# Altium PCB BD1_yd_V1.0.PcbDoc (part 1 of 2)
Units mm, origin at the board's own origin, x right, y up, seen from the top; angles counter-clockwise.
Board outline 135.9 x 133.4 mm, 4 copper layers (Top Layer, Signal Layer 1, Signal Layer 2, Bottom Layer), stack 0.778 mm thick; 102 components, 201 nets, 640 pads, 101 vias.
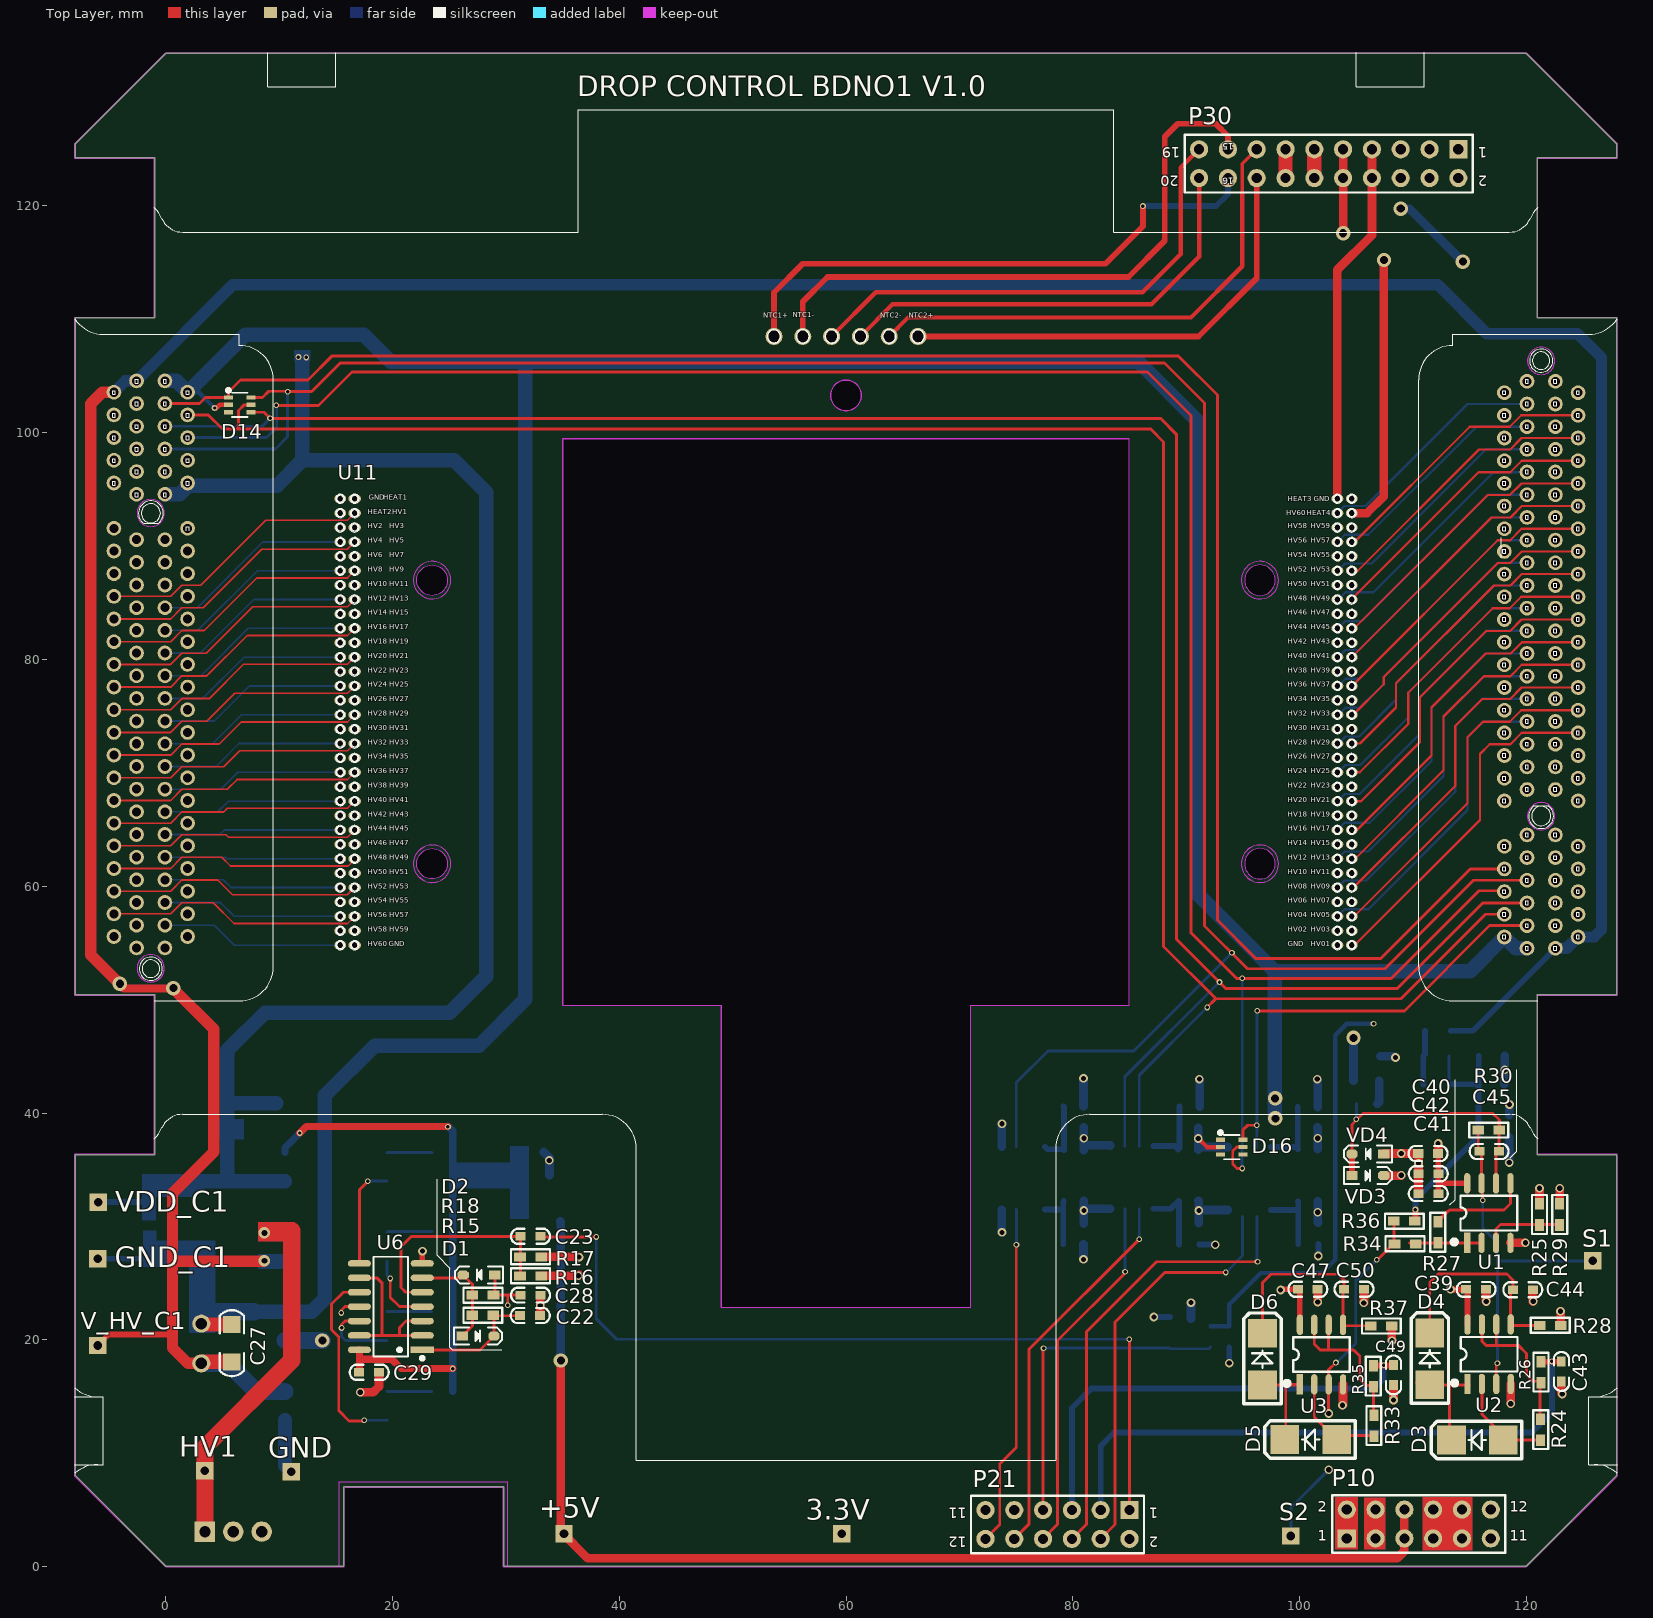
[diagram p0: Top Layer view]
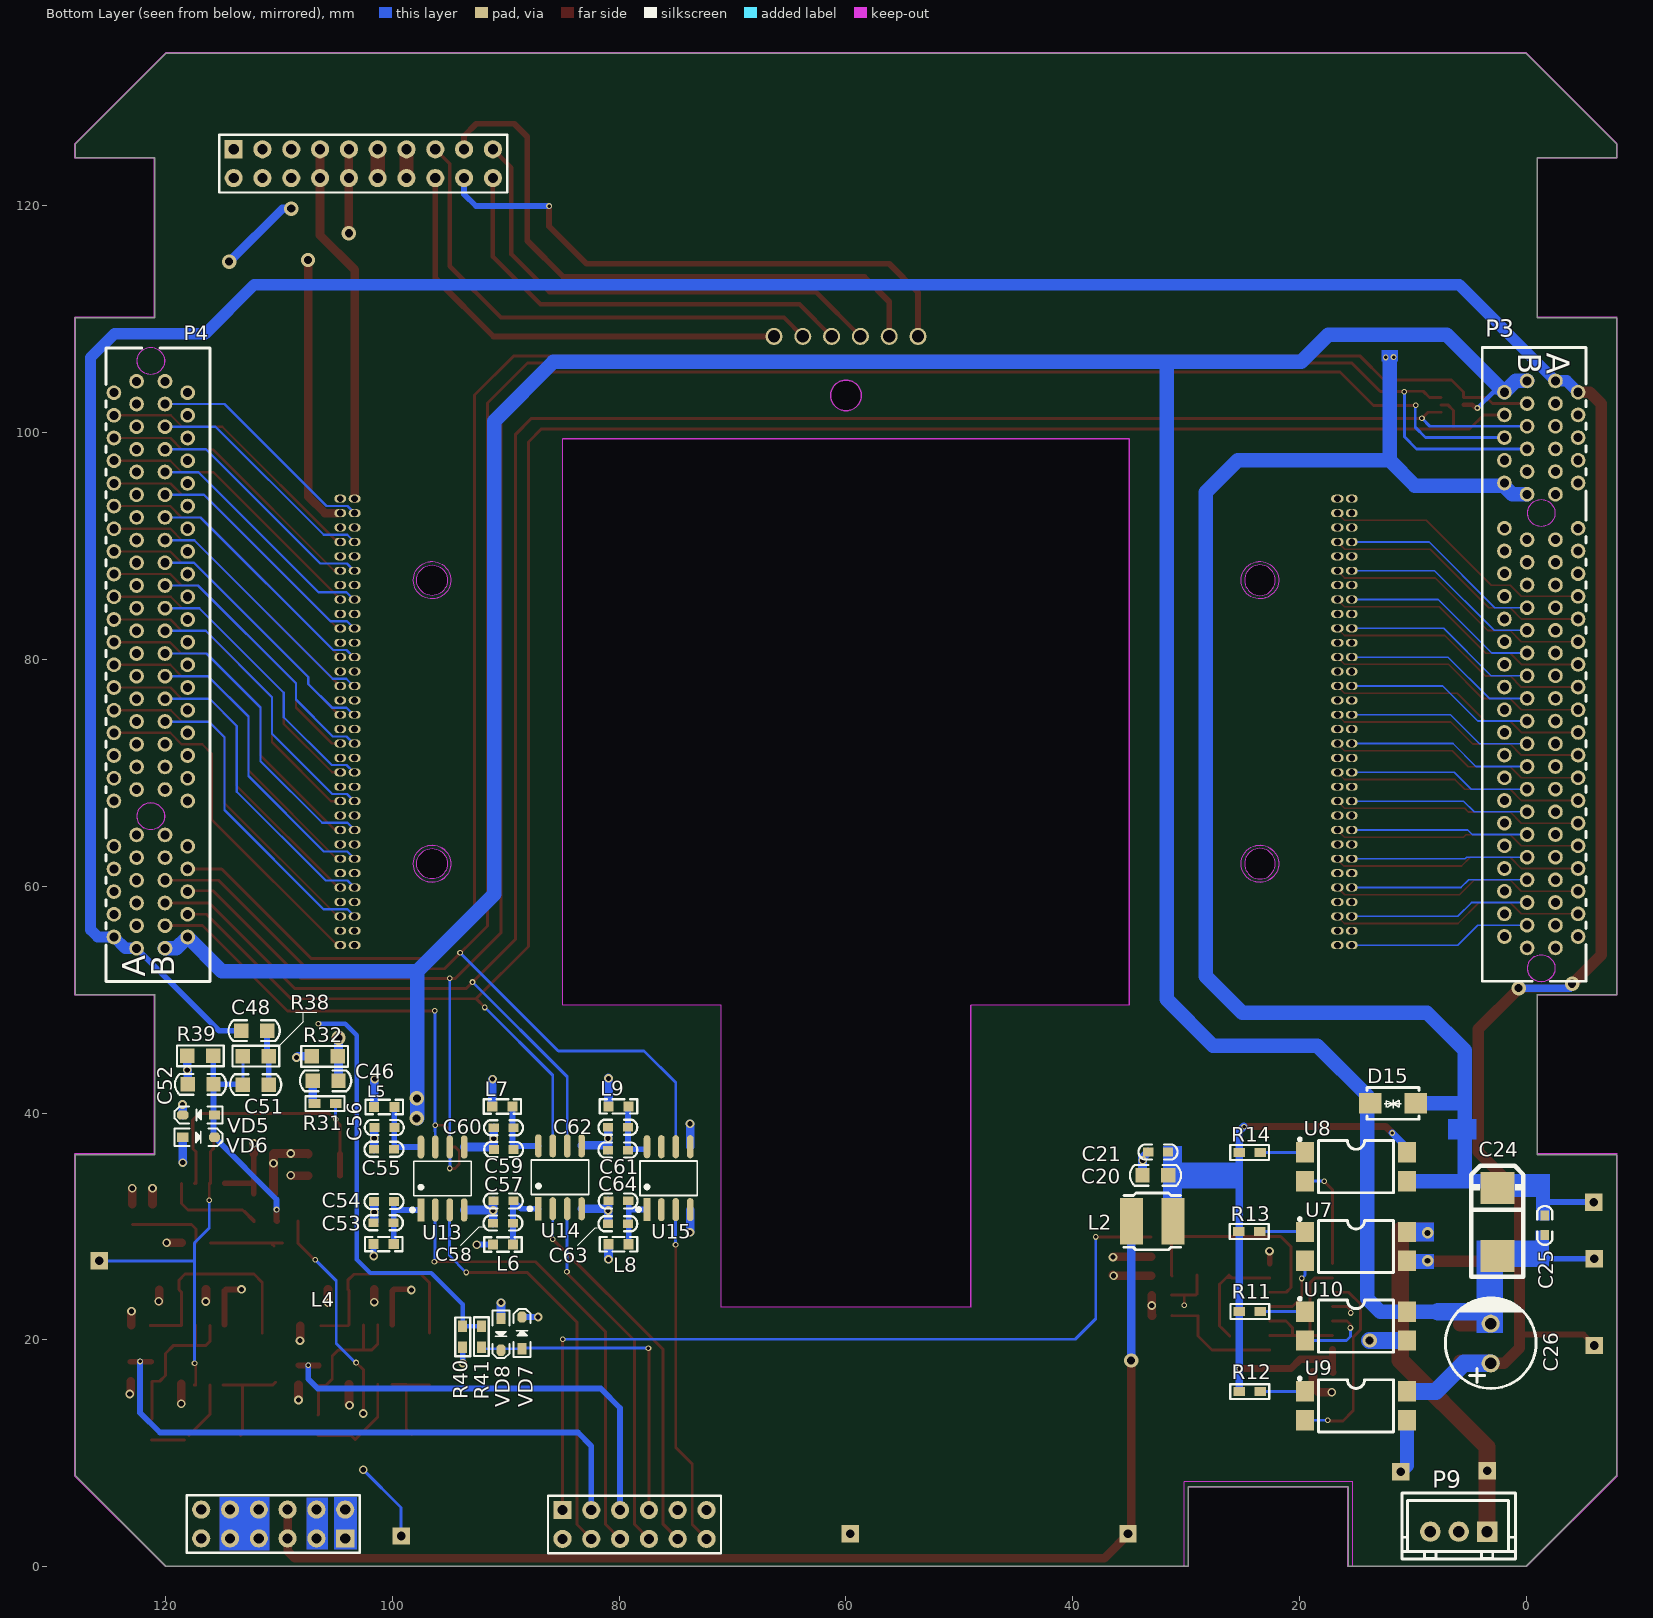
[diagram p1: Bottom Layer view, seen from below]
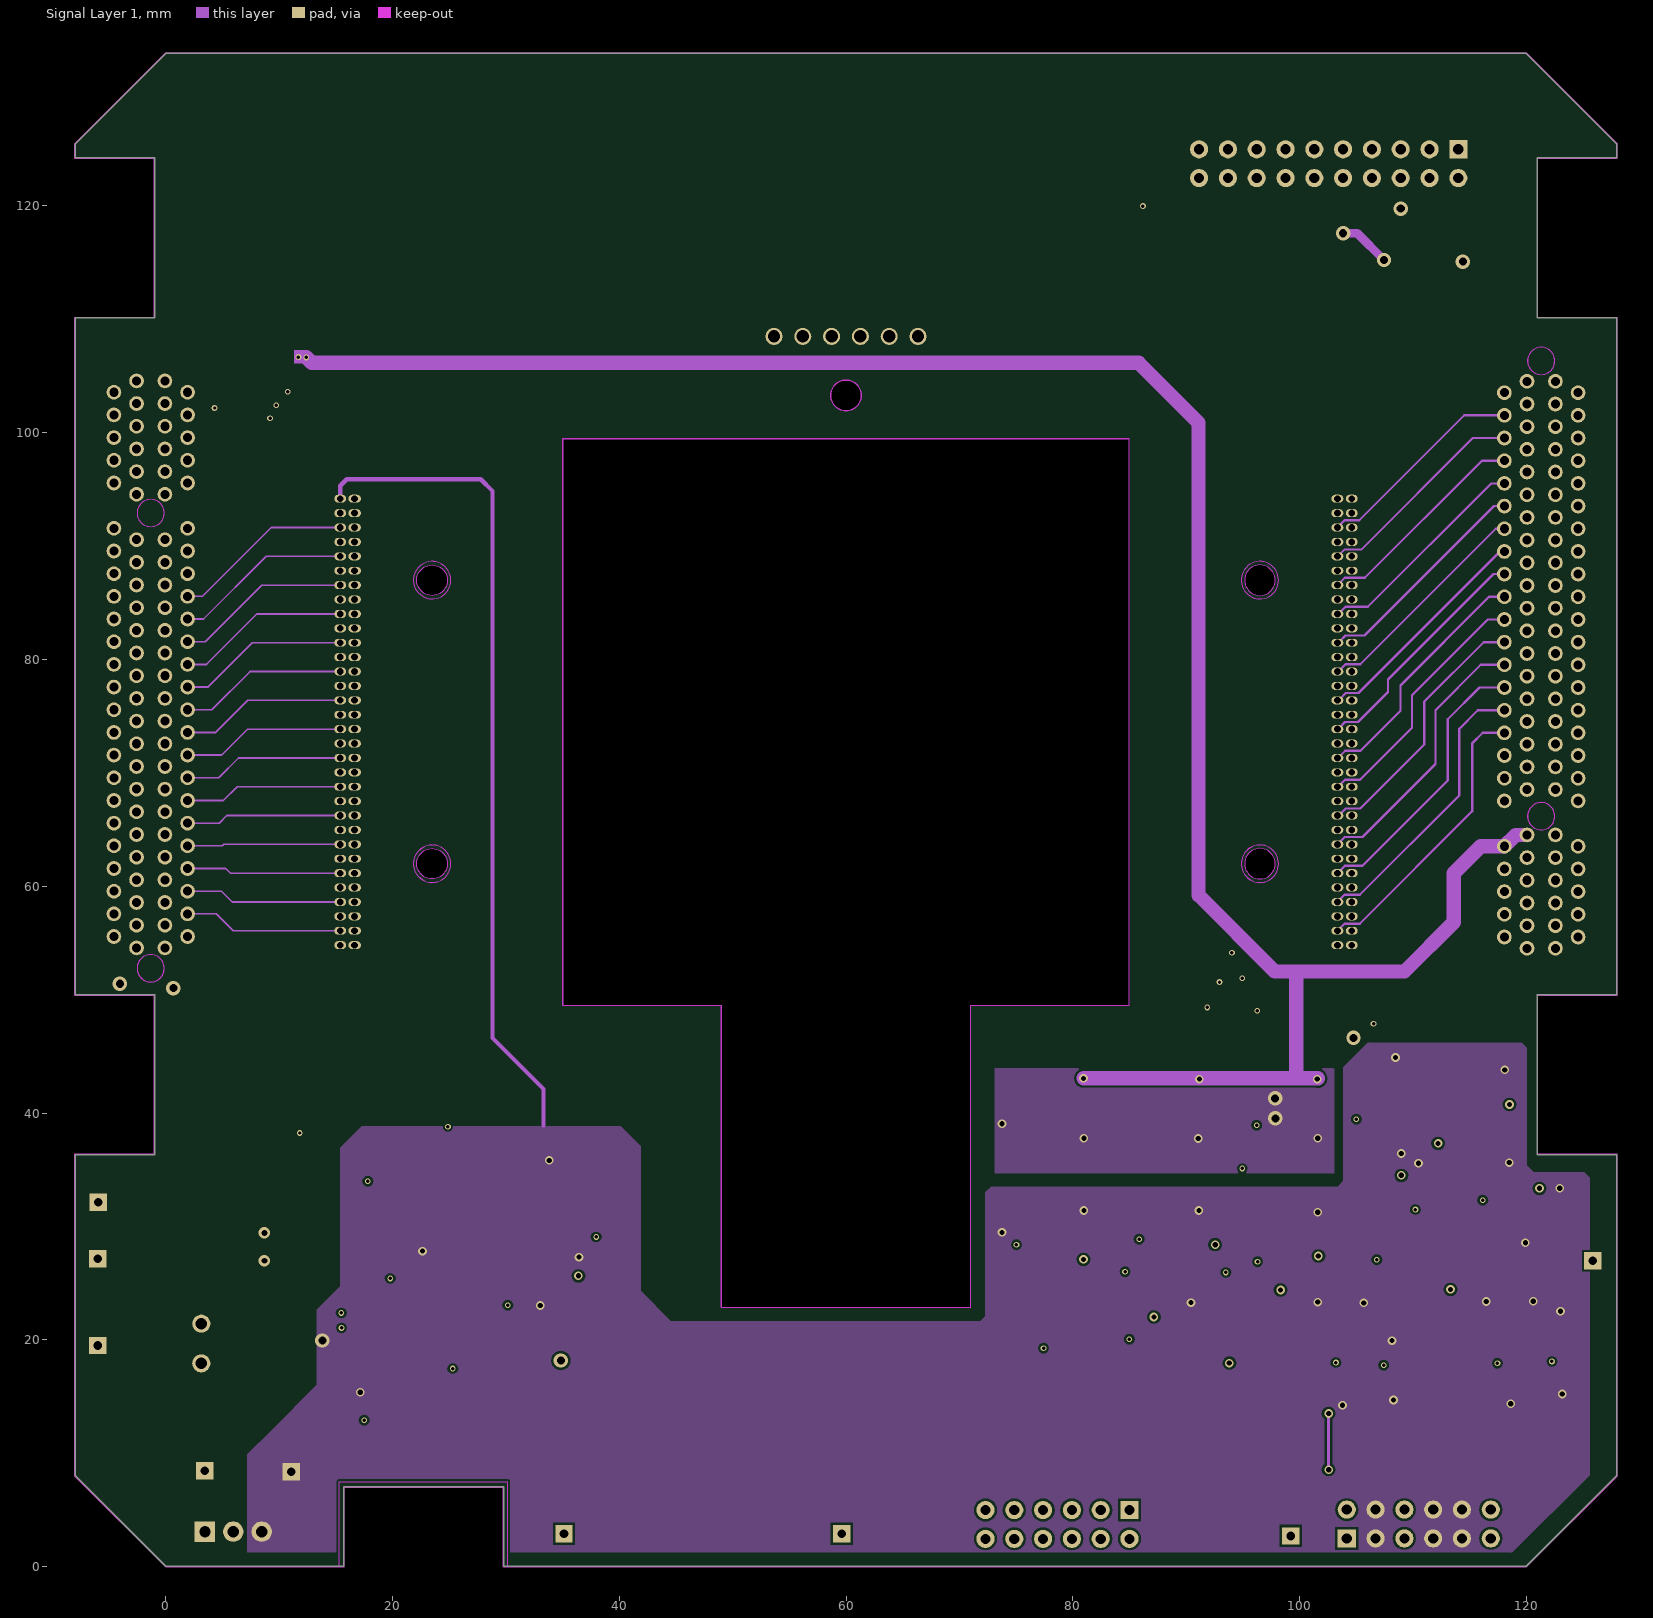
[diagram p2: Signal Layer 1]
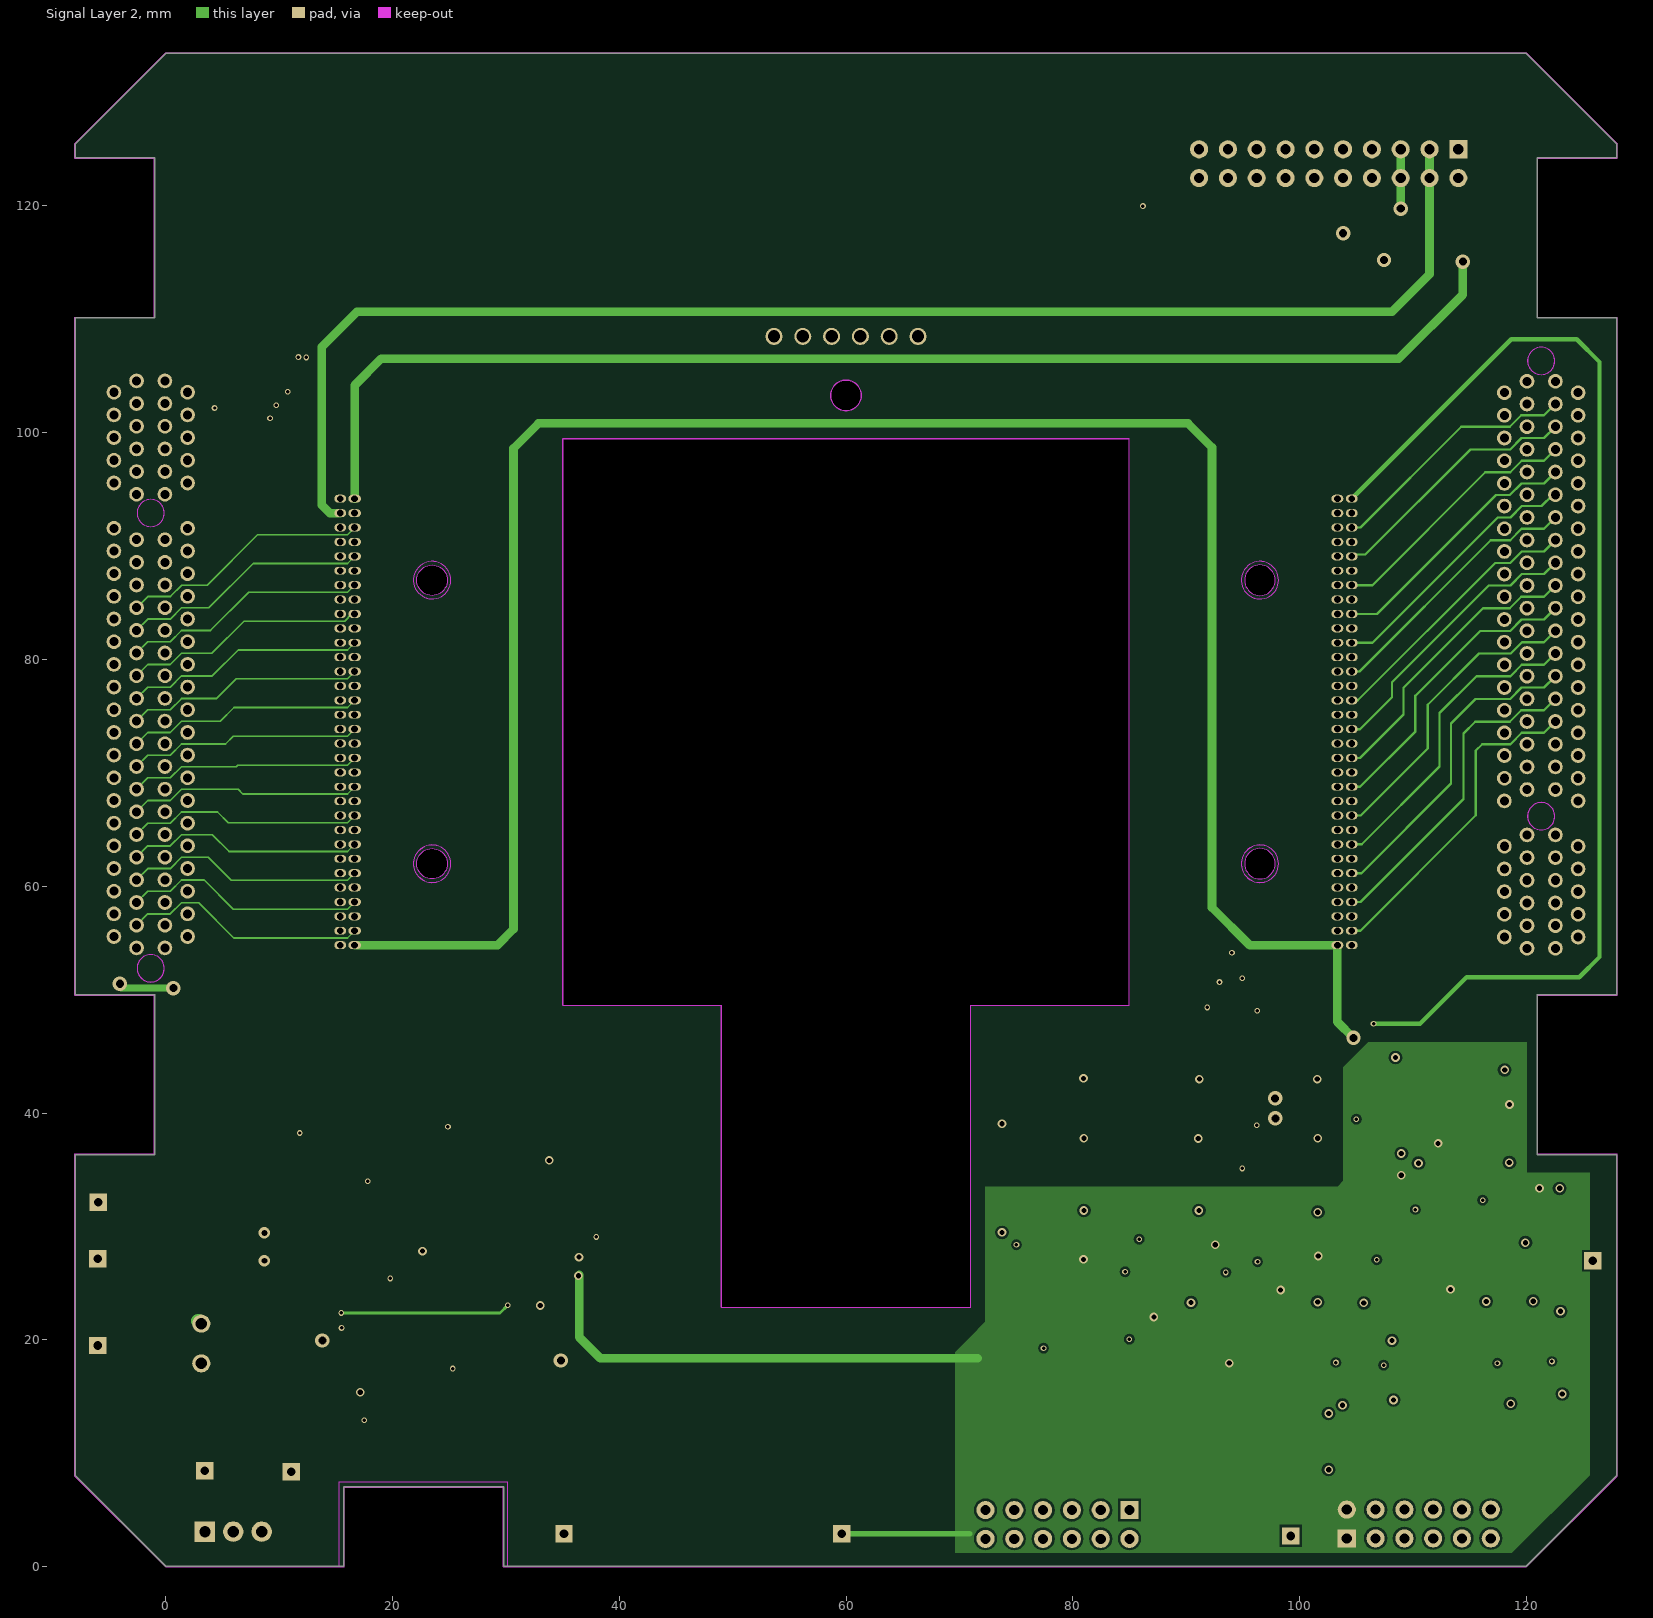
[diagram p3: Signal Layer 2]

## Layer stack, top to bottom
Top Layer: signal copper 0.0356
Dielectric: core 0.254, FR-4, Dk 4.2
Signal Layer 1: signal copper 0.036
Dielectric: prepreg 0.127, Dk 4.2
Signal Layer 2: signal copper 0.036
Dielectric: core 0.254, Dk 4.2
Bottom Layer: signal copper 0.0356

## Board outline
-7.95,8.021 -7.95,36.35 -1,36.35 ccw(c-1,36.4) -0.95,36.4 -0.95,50.4 ccw(c-1,50.4) -1,50.45 -7.95,50.45 -7.95,110.15 -1,110.15 ccw(c-1,110.2) -0.95,110.2 -0.95,124.2 ccw(c-1,124.2) -1,124.25 -7.95,124.25 -7.95,125.479 0.021,133.45 119.979,133.45 127.95,125.479 127.95,124.25 121,124.25 ccw(c121,124.2) 120.95,124.2 120.95,110.2 ccw(c121,110.2) 121,110.15 127.95,110.15 127.95,50.45 121,50.45 ccw(c121,50.4) 120.95,50.4 120.95,36.4 ccw(c121,36.4) 121,36.35 127.95,36.35 127.95,8.021 119.979,0.05 127.95,8.021 119.979,0.05 29.824,0.05 29.824,7 ccw(c29.773,7) 29.773,7.05 15.773,7.05 ccw(c15.773,7) 15.723,7 15.723,0.05 0.021,0.05
cut-out: 35,49.495 49,49.495 49,22.895 71,22.895 71,49.495 85,49.495 85,99.495 35,99.495
cut-out: 60,101.945 cw(c60,103.295) 58.65,103.295 cw(c60,103.295) 60,104.645 cw(c60,103.295) 61.35,103.295 cw(c60,103.295)
cut-out: 95.15,62 ccw(c96.5,62) 96.5,60.65 ccw(c96.5,62) 97.85,62 ccw(c96.5,62) 96.5,63.35 ccw(c96.5,62)
cut-out: 95.15,87 ccw(c96.5,87) 96.5,85.65 ccw(c96.5,87) 97.85,87 ccw(c96.5,87) 96.5,88.35 ccw(c96.5,87)
cut-out: 23.5,85.65 cw(c23.5,87) 22.15,87 cw(c23.5,87) 23.5,88.35 cw(c23.5,87) 24.85,87 cw(c23.5,87)
cut-out: 23.5,60.65 cw(c23.5,62) 22.15,62 cw(c23.5,62) 23.5,63.35 cw(c23.5,62) 24.85,62 cw(c23.5,62)

## Design rules (kind name [scope] priority, off if disabled: settings)
Clearance Clearance_2 [InComponent('U4')] p1: gap=0.178
Clearance Clearance_4 [InComponent('U11')] p2: gap=0.178
Clearance Clearance_1 [InComponent('USB1')] p3: gap=0.152
Clearance Clearance_3 [InNetClass('HV Class')] p4: gap=0.7
Clearance [All] p5: gap=0.203
HoleSize [All] p1: absolutevalues=TRUE maxlimit=2539.975 minlimit=0.025 maxpercent=80.000 minpercent=20.000
MinimumSolderMaskSliver [All] p1: minsoldermaskwidth=0
PlaneConnect [InPadClass('All Pads')] p1: planeconnectstyle=Direct reliefexpansion=0.508 reliefentries=4 reliefconductorwidth=0.254 reliefairgap=0.254
PolygonConnect PolygonConnect_2 [IsVia] p1: connectstyle=Direct reliefconductorwidth=0.254 reliefentries=4 polygonreliefangle="90 Angle" airgapwidth=0.254
PolygonConnect PolygonConnect_1 [All vs InNet('GND')] p2: connectstyle=Direct reliefconductorwidth=0.254 reliefentries=4 polygonreliefangle="90 Angle" airgapwidth=0.254
PolygonConnect [All] p3: connectstyle=Direct reliefconductorwidth=0.254 reliefentries=4 polygonreliefangle="90 Angle" airgapwidth=0.254
RoutingVias RoutingVias_2 [All] p1: holewidth=0.457 width=0.762 viastyle="Through Hole" minholewidth=0.305 minwidth=0.508 maxholewidth=0.711 maxwidth=1.27
RoutingVias RoutingVias_1 [All] p2: holewidth=0.305 width=0.508 viastyle="Through Hole" minholewidth=0.305 minwidth=0.508 maxholewidth=0.305 maxwidth=0.508
RoutingVias [All] p3: holewidth=0.305 width=2.54 viastyle="Through Hole" minholewidth=0.508 minwidth=2.54 maxholewidth=1.27 maxwidth=2.54
SilkToSilkClearance [All] p1: silktosilkclearance=0
SilkToSolderMaskClearance [IsPad] p1: minsilkscreentomaskgap=0 clearancetoexposedcopper=TRUE
SolderMaskExpansion [All] p1: expansion=0.102
Width [All] p1: maxlimit=5.08 minlimit=0.152 preferedwidth=0.254 minimp=50.000000 maximp=50.000000 favimp=50.000000
23 further rules are at their usual default settings.

## Classes and differential pairs
component class AC_SWITH: C20 C21 C22 C23 C24 C25 C26 C27 C28 C29 D1 D2 D15 L2 R11 R12 R13 R14 R15 R16 R17 R18 U6 U7 U8 U9 U10
component class Feedback: C39 C40 C41 C42 C43 C44 C45 C46 C47 C48 C49 C50 C51 C52 D3 D4 D5 D6 R24 R25 R26 R27 R28 R29 R30 R31 R32 R33 R34 R35 R36 R37 R38 R39 U1 U2 U3 VD3 VD4 VD5 VD6
component class ISO_signal: C53 C54 C55 C56 C57 C58 C59 C60 C61 C62 C63 C64 L4 L5 L6 L7 L8 L9 R40 R41 U13 U14 U15 VD7 VD8
component class ArrayPCIE: D14 D16 P3 P4 U11
component class Connect: P9 P10 P21 P30

## Components (designator, comment, footprint, x,y, rotation, side; value= is the part's Value field where it differs from the comment)
C20 "10uF" "C 0805" 32.712,34.521 r180 bottom
C21 "0.1uF" "C 0603" 32.484,36.578 r0 bottom
C22 "3.3nF" "C 0603" 32.154,22.151 r0 top
C23 "0.1uF" "C 0603" 32.179,29.136 r0 top
C24 "100uF/25V" CASE-D_7343 2.557,30.397 r90 bottom
C25 "0.1uF" "C 0603" -1.628,30.101 r270 bottom
C26 "4.7uF/400V" CAP-TH_BD8.0-P3.50-D0.6-FD 3.147,19.687 r90 bottom
C27 "0.1uF/450V" "C 1206" 5.839,19.713 r270 top
C28 "3.3nf" "C 0603" 32.179,23.954 r0 top
C29 "0.1uF" "C 0603" 17.955,17.147 r0 top
C39 "0.1uF" "C 0603" 115.57,24.46 r0 top
C40 "0.1uF" "C 0603" 111.328,36.449 r180 top
C41 "0.1uF" "C 0603" 111.349,32.908 r180 top
C42 "1uF" "C 0603" 111.349,34.661 r180 top
C43 "1uF" "C 0603" 123.088,17.221 r90 top
C44 "0.1uF" "C 0603" 119.685,24.435 r180 top
C45 "10pF" "C 0603" 116.713,36.627 r180 top
C46 "1uF" "C 0805" 105.893,42.85 r0 bottom
C47 "0.1uF" "C 0603" 100.732,24.477 r0 top
C48 "1uF" "C 0805" 112.192,47.269 r180 bottom
C49 "1uF" "C 0603" 108.28,16.916 r90 top
C50 "0.1uF" "C 0603" 104.796,24.477 r180 top
C51 "30pF" "C 0805" 112.065,42.52 r180 bottom
C52 "270pF" "C 0805" 116.916,42.545 r180 bottom
C53 "1uF" "C 0603" 100.793,30.331 r0 bottom
C54 "0.1uF" "C 0603" 100.743,32.211 r0 bottom
C55 "0.1uF" "C 0603" 100.743,36.808 r0 bottom
C56 "1uF" "C 0603" 100.717,38.738 r0 bottom
C57 "1uF" "C 0603" 90.227,32.261 r0 bottom
C58 "0.1uF" "C 0603" 90.252,30.306 r0 bottom
C59 "0.1uF" "C 0603" 90.194,36.796 r0 bottom
C60 "1uF" "C 0603" 90.202,38.713 r0 bottom
C61 "0.1uF" "C 0603" 80.114,36.745 r0 bottom
C62 "1uF" "C 0603" 80.114,38.752 r0 bottom
C63 "1uF" "C 0603" 80.114,30.243 r0 bottom
C64 "0.1uF" "C 0603" 80.092,32.261 r0 bottom
D1 "1N4148" SOD-323 27.556,20.348 r0 top
D2 "1N4148" SOD-323 27.632,25.732 r180 top
D3 "SS34" SMA 113.386,11.176 r180 top
D4 "SS34" SMA 111.481,20.625 r90 top
D5 "SS34" SMA 98.7,11.216 r180 top
D6 "SS34" SMA 96.723,20.599 r90 top
D14 "PESD5V0L5UY" SOT-363_L2.1-W1.3-P0.65-LS2.2-BL 6.528,102.464 r270 top
D15 "SMAJ5.0CA" SMA_L4.4-W2.6-LS5.0-BI 11.76,40.869 r180 bottom
D16 "PESD5V0L5UY" SOT-363_L2.1-W1.3-P0.65-LS2.2-BL 94.005,37.008 r270 top
L2 "10uH/2A" IND-SMD_L5.0-W5.0_LQH5BPBXX 32.992,30.457 r180 bottom
L4 "120欧姆磁珠" "L 0603" 100.768,28.451 r180 bottom
L5 "120欧姆磁珠" "L 0603" 100.717,40.542 r0 bottom
L6 "120欧姆磁珠" "L 0603" 90.252,28.426 r180 bottom
L7 "120欧姆磁珠" "L 0603" 90.303,40.593 r0 bottom
L8 "120欧姆磁珠" "L 0603" 80.052,28.441 r180 bottom
L9 "120欧姆磁珠" "L 0603" 80.052,40.604 r0 bottom
P3 "3091-10102T" CONN-TH_98P-P1.00-V_3183-XXXXXPXT -2.562,104.575 r270 bottom locked
P4 "3091-10102T" CONN-TH_98P-P1.00-V_3183-XXXXXPXT 122.559,54.537 r90 bottom locked
P9 "HX-XH2.54-3PZZ-R" CONN-TH_3P-P2.50_HX-XH2.54-3PZZ-B 5.969,3.099 r180 bottom
P10 "Header 6X2" HDR-6X2 104.16,2.5 r0 top locked
P21 "Header 6X2" HDR-6X2 85,5 r180 top locked
P30 "Header 10X2" HDR-10X2 114,125 r180 top
R11 "220" "R 0603" 24.381,22.507 r180 bottom
R12 "220" "R 0603" 24.399,15.445 r180 bottom
R13 "220" "R 0603" 24.432,29.568 r180 bottom
R14 "220" "R 0603" 24.407,36.527 r180 bottom
R15 "10K" "R 0603" 27.979,22.182 r180 top
R16 "15K" "R 0603" 32.179,25.656 r0 top
R17 "680K" "R 0603" 32.179,27.333 r180 top
R18 "10K" "R 0603" 27.988,23.954 r180 top
R24 "10K" "R 0603" 121.26,12.09 r270 top
R25 "10K" "R 0603" 121.158,31.064 r90 top
R26 "10K" "R 0603" 121.285,17.17 r270 top
R27 "10K" "R 0603" 112.187,29.504 r270 top
R28 "10K" "R 0603" 122.098,21.285 r0 top
R29 "10K" "R 0603" 122.936,31.064 r270 top
R30 "15K" "R 0603" 116.688,38.506 r0 top
R31 "0R" "R 0603" 105.943,40.843 r0 bottom
R32 "NC" "R 0805" 105.969,45.009 r0 bottom
R33 "10K" "R 0603" 106.553,12.446 r270 top
R34 "10K" "R 0603" 109.296,28.473 r0 top
R35 "10K" "R 0603" 106.502,16.815 r270 top
R36 "10K" "R 0603" 109.245,30.48 r0 top
R37 "10K" "R 0603" 107.213,21.234 r0 top
R38 "1M" "R 0805" 112.039,45.034 r180 bottom
R39 "5K" "R 0805" 116.942,45.06 r180 bottom
R40 "10K" "R 0603" 93.802,20.269 r90 bottom
R41 "0R" "R 0603" 92.151,20.295 r90 bottom
U1 "MCP6002" SOP8_N 116.685,31.186 r90 top
U2 "MCP6002" SOP8_N 116.713,18.745 r90 top
U3 "MCP6002" SOP8_N 101.928,18.709 r90 top
U6 "SN74AC14D" SOIC-14_L8.7-W3.9-P1.27-LS6.0-BL 19.86,22.938 r90 top
U7 "AQY210EH" RELAY-SMD_AQY210EHAX 15.025,28.248 r270 bottom
U8 "AQY210EH" RELAY-SMD_AQY210EHAX 15.025,35.277 r270 bottom
U9 "AQY210EH" RELAY-SMD_AQY210EHAX 15.025,14.189 r270 bottom
U10 "AQY210EH" RELAY-SMD_AQY210EHAX 15.025,21.219 r270 bottom
U11 "bioarray" BIOARRAY 16.67,94.185 r0 top locked
U13 "ADUM1200BRZ-RL7" SOIC-8_L4.9-W3.9-P1.27-LS6.0-BL 95.58,34.239 r180 bottom
U14 "ADUM1200BRZ-RL7" SOIC-8_L4.9-W3.9-P1.27-LS6.0-BL 85.22,34.343 r180 bottom
U15 "ADUM1200BRZ-RL7" SOIC-8_L4.9-W3.9-P1.27-LS6.0-BL 75.645,34.266 r180 bottom
VD3 "1N4148" SOD-323 106.021,34.494 r0 top
VD4 "1N4148" SOD-323 106.021,36.399 r180 top
VD5 "1N4148" SOD-323 117.089,39.842 r0 bottom
VD6 "1N4148" SOD-323 117.089,37.876 r180 bottom
VD7 "1N4148" SOD-323 88.57,20.625 r90 bottom
VD8 "1N4148" SOD-323 90.424,20.498 r270 bottom

## Footprints (in the part's own frame and the unit in brackets; to place one, negate y for a bottom-side part, rotate by r counter-clockwise, add the part's x,y. Pads: shape width x height; smd on the part's side, far side on the other; paste and mask are expansions set on the pad)
BIOARRAY [mm]
  oval 1.05x0.7 hole 0.6: 1(-1.27,0) 3(-1.27,-1.27) 5(-1.27,-2.54) 7(-1.27,-3.81) 9(-1.27,-5.08) 11(-1.27,-6.35) 13(-1.27,-7.62) 15(-1.27,-8.89) 17(-1.27,-10.16) 19(-1.27,-11.43) 21(-1.27,-12.7) 23(-1.27,-13.97) 25(-1.27,-15.24) 27(-1.27,-16.51) 29(-1.27,-17.78) 31(-1.27,-19.05) 33(-1.27,-20.32) 35(-1.27,-21.59) 37(-1.27,-22.86) 39(-1.27,-24.13) 41(-1.27,-25.4) 43(-1.27,-26.67) 45(-1.27,-27.94) 47(-1.27,-29.21) 49(-1.27,-30.48) 51(-1.27,-31.75) 53(-1.27,-33.02) 55(-1.27,-34.29) 57(-1.27,-35.56) 59(-1.27,-36.83) 61(-1.27,-38.1) 63(-1.27,-39.37) 65(87.93,0) 66(86.66,0) 67(87.93,-1.27) 68(86.66,-1.27) 69(87.93,-2.54) 70(86.66,-2.54) 71(87.93,-3.81) 72(86.66,-3.81) 73(87.93,-5.08) 74(86.66,-5.08) 75(87.93,-6.35) 76(86.66,-6.35) 77(87.93,-7.62) 78(86.66,-7.62) 79(87.93,-8.89) 80(86.66,-8.89) 81(87.93,-10.16) 82(86.66,-10.16) 83(87.93,-11.43) 84(86.66,-11.43) 85(87.93,-12.7) 86(86.66,-12.7) 87(87.93,-13.97) 88(86.66,-13.97) 89(87.93,-15.24) 90(86.66,-15.24) 91(87.93,-16.51) 92(86.66,-16.51) 93(87.93,-17.78) 94(86.66,-17.78) 95(87.93,-19.05) 96(86.66,-19.05) 97(87.93,-20.32) 98(86.66,-20.32) 99(87.93,-21.59) 100(86.66,-21.59) 101(87.93,-22.86) 102(86.66,-22.86) 103(87.93,-24.13) 104(86.66,-24.13) 105(87.93,-25.4) 106(86.66,-25.4) 107(87.93,-26.67) 108(86.66,-26.67) 109(87.93,-27.94) 110(86.66,-27.94) 111(87.93,-29.21) 112(86.66,-29.21) 113(87.93,-30.48) 114(86.66,-30.48) 115(87.93,-31.75) 116(86.66,-31.75) 117(87.93,-33.02) 118(86.66,-33.02) 119(87.93,-34.29) 120(86.66,-34.29) 121(87.93,-35.56) 122(86.66,-35.56) 123(87.93,-36.83) 124(86.66,-36.83) 125(87.93,-38.1) 126(86.66,-38.1) 127(87.93,-39.37) 128(86.66,-39.37)
  oval 1.1x0.7 hole 0.6: 2(0,0) 4(0,-1.27) 6(0,-2.54) 8(0,-3.81) 10(0,-5.08) 12(0,-6.35) 14(0,-7.62) 16(0,-8.89) 18(0,-10.16) 20(0,-11.43) 22(0,-12.7) 24(0,-13.97) 26(0,-15.24) 28(0,-16.51) 30(0,-17.78) 32(0,-19.05) 34(0,-20.32) 36(0,-21.59) 38(0,-22.86) 40(0,-24.13) 42(0,-25.4) 44(0,-26.67) 46(0,-27.94) 48(0,-29.21) 50(0,-30.48) 52(0,-31.75) 54(0,-33.02) 56(0,-34.29) 58(0,-35.56) 60(0,-36.83) 62(0,-38.1) 64(0,-39.37)
  round 1.5 hole 1.1: 129(36.98,14.31) 130(39.52,14.31) 131(42.06,14.31) 132(44.6,14.31) 133(47.14,14.31) 134(49.68,14.31)
"C 0603" [mil]
  rect 35x30 smd: 1(-35,0) 2(34,0)
  silkscreen extent -67,-26 67,26, body extent -31,-16 31,16, height 32
"C 0805" [mil]
  rect 50x50 smd: 1(-45,0) 2(45,0)
  silkscreen extent -89,-36 89,36, body extent -39,-24 39,24, height 20
"C 1206" [mil]
  rect 60x60 smd: 1(-65,0) 2(65,0)
  silkscreen extent -115,-42 115,42, body extent -63,-32 63,32, height 48
CAP-TH_BD8.0-P3.50-D0.6-FD [mm]
  round 1.6 hole 1: 1(-1.75,0) 2(1.75,0)
  silkscreen extent -3.96,-4 4.04,4
CASE-D_7343 [mm]
  rect 2.799x3.01 smd: 1(3,0) 2(-3,0)
  silkscreen extent -4.83,-2.3 4.95,2.3
CONN-TH_3P-P2.50_HX-XH2.54-3PZZ-B [mm]
  rect 1.8x1.8 hole 1 paste+0 mask+0.05: 1(2.5,0)
  round 1.8 hole 1 paste+0 mask+0.05: 2(0,0) 3(-2.5,0)
  silkscreen extent -5,-2.4 5,3.4
CONN-TH_98P-P1.00-V_3183-XXXXXPXT [mm]
  round 1.3 hole 0.8 paste+0.051: A1(0,0) A2(1,2) A3(2,0) A4(3,2) A5(4,0) A6(5,2) A7(6,0) A8(7,2) A9(8,0) A10(9,2) A11(10,0) A12(13,2) A13(14,0) A14(15,2) A15(16,0) A16(17,2) A17(18,0) A18(19,2) A19(20,0) A20(21,2) A21(22,0) A22(23,2) A23(24,0) A24(25,2) A25(26,0) A26(27,2) A27(28,0) A28(29,2) A29(30,0) A30(31,2) A31(32,0) A32(33,2) A33(34,0) A34(35,2) A35(36,0) A36(37,2) A37(38,0) A38(39,2) A39(40,0) A40(41,2) A41(42,0) A42(43,2) A43(44,0) A44(45,2) A45(46,0) A46(47,2) A47(48,0) A48(49,2) A49(50,0) B1(0,-2.5) B2(1,-4.5) B3(2,-2.5) B4(3,-4.5) B5(4,-2.5) B6(5,-4.5) B7(6,-2.5) B9(8,-2.5) B11(10,-2.5) B13(14,-2.5) B15(16,-2.5) B17(18,-2.5) B18(19,-4.5) B19(20,-2.5) B20(21,-4.5) B21(22,-2.5) B22(23,-4.5) B23(24,-2.5) B24(25,-4.5) B25(26,-2.5) B26(27,-4.5) B27(28,-2.5) B28(29,-4.5) B29(30,-2.5) B30(31,-4.5) B31(32,-2.5) B32(33,-4.5) B33(34,-2.5) B34(35,-4.5) B35(36,-2.5) B36(37,-4.5) B37(38,-2.5) B38(39,-4.5) B39(40,-2.5) B40(41,-4.5) B41(42,-2.5) B42(43,-4.5) B43(44,-2.5) B44(45,-4.5) B45(46,-2.5) B46(47,-4.5) B47(48,-2.5) B48(49,-4.5) B49(50,-2.5)
  round 1.3 hole 0.8 copper offset 0,0 paste+0.051: B8(7,-4.5) B10(9,-4.5) B12(13,-4.5) B14(15,-4.5) B16(17,-4.5)
  Keep-Out Layer circle w0.003: c51.8,-1.25 r1.2
  Keep-Out Layer circle w0.003: c11.65,-1.25 r1.2
  Keep-Out Layer region: 12.86,-1.25 12.819,-1.563 12.698,-1.855 12.506,-2.106 12.255,-2.298 11.963,-2.419 11.65,-2.46 11.337,-2.419 11.045,-2.298 10.794,-2.106 10.602,-1.855 10.481,-1.563 10.44,-1.25 10.481,-0.937 10.602,-0.645 10.794,-0.394 11.045,-0.202 11.337,-0.081 11.65,-0.04 11.963,-0.081 12.255,-0.202 12.506,-0.394 12.698,-0.645 12.819,-0.937
  Keep-Out Layer region: 12.86,-1.25 12.819,-1.563 12.698,-1.855 12.506,-2.106 12.255,-2.298 11.963,-2.419 11.65,-2.46 11.337,-2.419 11.045,-2.298 10.794,-2.106 10.602,-1.855 10.481,-1.563 10.44,-1.25 10.481,-0.937 10.602,-0.645 10.794,-0.394 11.045,-0.202 11.337,-0.081 11.65,-0.04 11.963,-0.081 12.255,-0.202 12.506,-0.394 12.698,-0.645 12.819,-0.937
  Keep-Out Layer region: 53.01,-1.25 52.969,-1.563 52.848,-1.855 52.656,-2.106 52.405,-2.298 52.113,-2.419 51.8,-2.46 51.487,-2.419 51.195,-2.298 50.944,-2.106 50.752,-1.855 50.631,-1.563 50.59,-1.25 50.631,-0.937 50.752,-0.645 50.944,-0.394 51.195,-0.202 51.487,-0.081 51.8,-0.04 52.113,-0.081 52.405,-0.202 52.656,-0.394 52.848,-0.645 52.969,-0.937
  Keep-Out Layer region: 53.01,-1.25 52.969,-1.563 52.848,-1.855 52.656,-2.106 52.405,-2.298 52.113,-2.419 51.8,-2.46 51.487,-2.419 51.195,-2.298 50.944,-2.106 50.752,-1.855 50.631,-1.563 50.59,-1.25 50.631,-0.937 50.752,-0.645 50.944,-0.394 51.195,-0.202 51.487,-0.081 51.8,-0.04 52.113,-0.081 52.405,-0.202 52.656,-0.394 52.848,-0.645 52.969,-0.937
  Mechanical 1 keep-out circle w0.1: c51.8,-1.25 r1.2
  Mechanical 1 keep-out circle w0.1: c11.65,-1.25 r1.2
  silkscreen extent -2.94,-6.46 52.94,2.69
HDR-6X2 [mm]
  rect 1.6x1.6 hole 0.9: 1(0,0)
  round 1.6 hole 0.9: 2(0,2.54) 3(2.54,0) 4(2.54,2.54) 5(5.08,0) 6(5.08,2.54) 7(7.62,0) 8(7.62,2.54) 9(10.16,0) 10(10.16,2.54) 11(12.7,0) 12(12.7,2.54)
  silkscreen extent -1.27,-1.27 13.97,3.81, body extent -1.27,-1.27 13.97,3.81, height 8.5
HDR-10X2 [mm]
  rect 1.6x1.6 hole 0.9: 1(0,0)
  round 1.6 hole 0.9: 2(0,2.54) 3(2.54,0) 4(2.54,2.54) 5(5.08,0) 6(5.08,2.54) 7(7.62,0) 8(7.62,2.54) 9(10.16,0) 10(10.16,2.54) 11(12.7,0) 12(12.7,2.54) 13(15.24,0) 14(15.24,2.54) 15(17.78,0) 16(17.78,2.54) 17(20.32,0) 18(20.32,2.54) 19(22.86,0) 20(22.86,2.54)
  silkscreen extent -1.27,-1.27 24.13,3.81, body extent -1.27,-1.27 24.13,3.81, height 8.5
IND-SMD_L5.0-W5.0_LQH5BPBXX [mm]
  rect 2x4.1 smd: 1(-1.825,0) 2(1.825,0)
  silkscreen extent -2.52,-2.5 2.5,2.5
"L 0603" [mil] "С?"
  rect 35x35 smd: 1(-35,0) 2(35,0)
  silkscreen extent -65,-25 65,25, body extent -31,-16 31,16, height 31
"R 0603" [mil]
  rect 40x31.5 smd: 1(-36.5,0) 2(36.5,0)
  silkscreen extent -68,-26 67,26, body extent -31,-16 31,16, height 16
"R 0805" [mil]
  rect 50x50 smd: 1(-45,0) 2(45,0)
  silkscreen extent -81,-36 81,36, body extent -39,-25 39,25, height 20
RELAY-SMD_AQY210EHAX [mm]
  rect 1.8x1.6 smd: 1(-1.27,-4.5) 2(1.27,-4.5) 3(1.27,4.5) 4(-1.27,4.5)
  silkscreen extent -2.54,-5.08 2.3,3.3
SMA [mil]
  rect 100x100 smd: 1(-180,0) 2(0,0)
  silkscreen extent -245,-65 70,65
SMA_L4.4-W2.6-LS5.0-BI [mm]
  rect 2x1.8 smd: 1(-2,0) 2(2,0)
  silkscreen extent -2.3,-1.4 2.3,1.4
SOD-323 [mm]
  rect 1x0.8 smd: 1(-1.4,0)
  oct 1x0.8 smd: 2(1.4,0)
  silkscreen extent -2.11,-0.76 2.11,0.76, body extent -1.34,-0.63 1.31,0.67, height 1
SOIC-8_L4.9-W3.9-P1.27-LS6.0-BL [mm]
  rect 0.588x2.045 smd: 1(-1.905,-2.772)
  oval 0.588x2.045 smd: 2(-0.635,-2.772) 3(0.635,-2.772) 4(1.905,-2.772) 5(1.905,2.772) 6(0.635,2.772) 7(-0.635,2.772) 8(-1.905,2.772)
  silkscreen extent -2.8,-2.92 2.53,1.52
SOIC-14_L8.7-W3.9-P1.27-LS6.0-BL [mil]
  rect 22.6x80.24 smd: 1(-150,-109.02)
  oval 22.6x80.24 smd: 2(-100,-109.02) 3(-50,-109.02) 4(0,-109.02) 5(50,-109.02) 6(100,-109.02) 7(150,-109.02) 8(150,109.02) 9(100,109.02) 10(50,109.02) 11(0,109.02) 12(-50,109.02) 13(-100,109.02) 14(-150,109.02)
  silkscreen extent -185,-115 173,60
SOP8_N [mm]
  rect 1.8x0.55 smd: 1(-2.625,1.905)
  oval 1.8x0.55 smd: 2(-2.625,0.635) 3(-2.625,-0.635) 4(-2.625,-1.905) 5(2.625,-1.905) 6(2.625,-0.635) 7(2.625,0.635) 8(2.625,1.905)
  silkscreen extent -2.69,-2.5 1.52,3.2, body extent -3,-2.5 3,2.5, height 1.9
SOT-363_L2.1-W1.3-P0.65-LS2.2-BL [mm]
  rect 0.38x0.78 smd: 1(-0.65,-0.99) 2(0,-0.99) 3(0.65,-0.99) 4(0.65,0.99) 5(0,0.99) 6(-0.65,0.99)
  silkscreen extent -1.43,-1.14 1.08,0.7

## Part data
C20 C21 C22 C23 C25 C27 C28 C29 C39 C40 C41 C42 C43 C44 C45 C46 C47 C48 C49 C50 C51 C52: library part C, "无极性贴片电容"
C24: library part TAJD107K016RNJ
C26: library part ERK2GM4R7F09OT
C53 C54 C55 C56 C57 C58 C59 C60 C61 C62 C63 C64: library part C-CC, "直插瓷片电容"
D1 D2 VD3 VD4 VD5 VD6 VD7 VD8: "高速开关二极管"
D3 D4 D5 D6: library part 1N4148
D15: library part SMAJ5.0CA_C83324
L2: library part LQH5BPB100MT0L
L4 L5 L6 L7 L8 L9: library part FERRITBEAD
P10 P21: "Header, 6-Pin, Dual row"
P30: "Header, 10-Pin, Dual row"
R11 R12 R13 R14 R15 R16 R17 R18 R24 R25 R26 R27 R28 R29 R30 R31 R32 R33 R34 R35 R36 R37 R38 R39 R40 R41: library part R, "贴片电阻"
U1 U2 U3: library part AD823AN
U6: library part SN74LS14D, "Hex Schmitt-Trigger Inverter"

## Free pads (board coordinates)
  rect 1.524x1.524 hole 0.762: 0(-5.994,19.507) 0(-5.994,27.153) 0(-5.944,32.156) 0(3.454,8.458) 0(11.074,8.382) 0(35.128,2.921) 0(59.614,2.921) 0(99.212,2.718) 0(125.857,26.975)

## Via types
v1: diameter 0.762, hole 0.457, Top Layer to Bottom Layer, 48 vias
v2: diameter 0.508, hole 0.305, Top Layer to Bottom Layer, 40 vias
v3: diameter 1.27, hole 0.711, Top Layer to Bottom Layer, 11 vias
v4: diameter 1.016, hole 0.508, Top Layer to Bottom Layer, 2 vias

## Nets (pads, with @x,y where several pads share a name; then routed paths per layer and width w, separated by ;. In a path a pad name is that pad's centre, name@x,y a point inside that pad or via, vN(x,y) a via of type N, cw(c..) or ccw(c..) an arc to the next point about the centre after c; other vN are vias at no path point)
GND: C20.1 C21.2 C22.2 C28.2 C29.2 C39.2 C40.2 C41.2 C42.2 C43.1 C44.1 C47.2 C49.1 C50.1 C52.1 C53.2 C54.2 C57.2 C58.2 C63.2 C64.2 P9.3 P10.3 P10.4 P10.7 P10.8 P10.9 P10.10 pad.0@11.074,8.382 R17.1 R28.2 R29.1 R32.2 R37.2 R39.1 U1.4 U2.4 U3.4 U6.7 U9.3 U10.3 U11.1 U13.4 U14.4 U15.4 VD4.1 VD6.1 VD8.1 | length 135.6
  Top Layer w0.508: U6.7@22.629,26.748 22.629,27.811 v1(22.657,27.838)
  Top Layer w0.762: v1(17.17,15.392) 18.313,15.392 18.819,15.898 C29.2@18.819,17.147 ; C22.2@33.017,22.151 33.043,22.176 v1(33.043,23.038) C28.2@33.043,23.954 ; R17.1@33.106,27.333 36.421,27.333 v1(36.449,27.305) ; v1(101.595,23.338) C47.2@101.595,24.477 ; v1(103.784,14.249) 103.833,14.298 U3.4@103.833,16.084 ; v1(105.664,23.266) 105.685,23.287 C50.1@105.685,24.477 ; VD4.1@107.421,36.399 107.471,36.449 v1(108.966,36.449) C40.2@110.465,36.449 110.485,36.428 v1(110.485,35.585) C41.2@110.485,32.908 ; R37.2@108.141,21.234 108.141,19.952 v1(108.153,19.939) ; v1(108.28,14.707) C49.1@108.28,16.027 ; C39.2@116.434,24.46 116.434,23.419 v1(116.459,23.393) ; U1.4@118.59,28.561 119.9,28.561 v1(119.913,28.575) ; v1(118.618,14.376) U2.4@118.618,16.12 ; C44.1@120.574,24.435 120.574,23.393 v1(120.599,23.419) ; R29.1@122.936,31.991 v1(122.936,33.376) ; v1(123.012,22.53) 123.025,22.517 R28.2@123.025,21.285 ; C43.1@123.088,16.332 123.088,15.316 v1(123.165,15.24)
  Signal Layer 1 w0.381: U11.1@15.4,94.185 15.4,95.334 15.977,95.91 27.788,95.91 28.829,94.869 28.829,46.634 33.325,42.139 33.325,38.938
  Bottom Layer w0.762: C21.2@33.347,36.578 33.855,36.07 C20.1@33.855,34.521 ; U15.4@73.74,31.494 73.74,29.511 v1(73.762,29.489) ; C64.2@80.956,32.261 v1@80.956,31.547 ; C63.2@80.978,30.243 80.956,30.264 v1@80.956,31.547 ; U14.4@83.315,31.57 80.979,31.57 v1@80.956,31.547 ; VD8.1@90.424,21.898 v1(90.424,23.292) ; C57.2@91.091,32.261 91.116,32.236 v1(91.116,31.42) ; C58.2@91.116,30.306 v1(91.116,31.42) ; U13.4@93.675,31.467 91.163,31.467 v1(91.116,31.42) ; C54.2@101.606,32.211 v1(101.606,31.267) 101.606,30.382 C53.2@101.657,30.331 ; R32.2@107.112,45.009 108.356,45.009 v1(108.458,44.907) ; C52.1@118.059,42.545 118.059,43.79 v1(118.085,43.815) R39.1@118.085,45.06 ; VD6.1@118.489,37.876 118.489,35.711 118.466,35.687 118.491,35.662 v1(118.491,35.636)
  Bottom Layer w1.016: v3(13.827,19.949) v3@13.843,19.964
  Bottom Layer w1.27: U9.3@10.524,12.919 10.524,8.932 pad.0@11.074,8.382
  Bottom Layer w1.524: U10.3@10.524,19.949 v3(13.827,19.949)
  other v1: 80.975,31.42 33.833,35.839
GND_C1: C24.2 C25.2 C26.2 C27.1 C55.2 C56.2 C59.2 C60.2 C61.2 C62.2 D14.2 D15.1 D16.2 P3.B1 P3.B2 P4.B1 P4.B2 pad.0@-5.994,27.153 U10.4 U13.5 U14.5 U15.5 | length 319.9
  Top Layer w0.381: v2(4.318,102.184) 4.343,102.159 4.47,102.159 4.775,102.464 D14.2@5.538,102.464 ; v1(91.065,37.77) 91.827,37.008 D16.2@93.015,37.008
  Top Layer w1.27: C26.2@3.147,21.437 3.22,21.364 C27.1@5.839,21.364
  Signal Layer 2 w1.27: C26.2@2.895,21.676 C26.2@3.141,21.431
  Bottom Layer w0.381: P3.B2@1.938,103.575 2.927,103.575 v2(4.318,102.184)
  Bottom Layer w0.508: pad.0@-5.994,27.153 -0.991,27.153 -0.864,27.28
  Bottom Layer w0.762: U15.5@73.74,37.039 73.74,39.043 v1(73.762,39.065) ; C61.2@80.978,36.745 80.978,37.155 ; C62.2@80.978,38.752 v1(80.978,37.795) 80.978,37.155 ; U14.5@83.315,37.115 83.275,37.155 80.978,37.155 ; C59.2@91.058,36.796 C59.2@91.065,36.803 ; C60.2@91.065,38.713 v1(91.065,37.77) C59.2@91.065,36.803 ; U13.5@93.675,37.012 91.274,37.012 C59.2@91.065,36.803 ; C56.2@101.581,38.738 101.606,38.713 v1(101.606,37.795) C55.2@101.606,36.808
  Bottom Layer w1.27: P3.B1@-0.062,104.575 0.938,104.575 P3.B2@1.938,103.575 7.019,108.656 17.465,108.656 19.858,106.263 31.725,106.263 ; C26.2@3.147,21.437 4.198,22.489 ; 7.798,22.489 U10.4@10.524,22.489 12.887,22.489 14.046,23.647 14.046,41.554 18.44,45.949 27.635,45.949 31.725,50.038 31.725,106.263 ; v3@97.821,39.548 97.821,52.521 ; P4.B1@120.059,54.537 119.059,54.537 P4.B2@118.059,55.537 115.043,52.521 97.821,52.521 ; 31.725,106.263 85.801,106.263 91.034,101.031 91.034,59.309 97.821,52.521
  Bottom Layer w1.524: 4.198,22.489 7.798,22.489
  other v3: 97.866,39.548 97.841,41.3
NetC22_1: C22.1 D1.2 R15.1 U6.1 | length 10.9
  Top Layer w0.254: U6.1@22.629,19.128 27.737,19.128 D1.2@28.956,20.348 28.956,22.131 31.245,22.131 C22.1@31.265,22.151
NetC23_1: C23.1 R16.1 R17.2 U6.5 | length 20.1
  Top Layer w0.2: C23.1@31.252,29.098 C23.1@31.29,29.136
  Top Layer w0.254: U6.5@22.629,24.208 21.181,24.208 20.749,24.64 20.749,28.217 21.668,29.136 C23.1@31.29,29.136 31.29,25.694 R16.1@31.252,25.656
NetC23_2: C23.2 P21.1 | length 74.9
  Top Layer w0.254: C23.2@33.096,29.083 v2(37.973,29.083) ; v2(84.988,20.066) 85,20.054 P21.1@85,5
  Bottom Layer w0.254: v2(37.973,29.083) 37.973,21.869 39.776,20.066 v2(84.988,20.066)
NetC28_1: C28.1 D2.1 R18.1 U6.11 | length 21.7
  Top Layer w0.254: v2@15.517,22.481 15.517,22.634 15.821,22.938 U6.11@17.091,22.938 ; D2.1@29.032,25.732 29.032,24.072 29.15,23.954 30.172,23.954 ; v2(30.172,23.065) 30.172,23.954 ; C28.1@31.29,23.954 30.172,23.954
  Signal Layer 2 w0.254: v2(15.491,22.38) 29.487,22.38 v2(30.172,23.065)
NetC43_2: C43.2 P21.3 R26.1 | length 53
  Top Layer w0.508: R26.1@121.298,18.085 C43.2@123.088,18.085
  Bottom Layer w0.508: P21.3@82.46,5 82.46,10.654 83.642,11.836 120.498,11.836 122.25,13.589 v2(122.25,18.11)
NetC44_2: C44.2 D4.2 R28.1 U2.5 | length 19.1
  Top Layer w0.254: D4.2@111.481,20.625 111.481,25.07 112.217,25.806 118.288,25.806 118.821,25.273 C44.2@118.821,24.435 118.616,24.229 118.616,21.264 R28.1@121.358,21.264
NetC45_1: C45.1 R30.2 R31.1 U1.6 VD3.1 VD4.2 | length 26.2
  Top Layer w0.254: VD4.2@104.621,36.399 104.621,39.013 105.588,39.98 117.039,39.98 117.572,39.446 ; U1.6@117.32,33.811 117.32,36.593 117.572,36.845 117.572,39.446 ; U1.6@117.435,33.831 U1.6@117.454,33.811 ; R30.2@117.615,38.506 117.615,39.404 117.572,39.446
  Top Layer w0.5: VD3.1@104.621,34.494 VD4.2@104.621,36.399
  Bottom Layer w0.254: v2(105.004,39.472) 105.016,39.484 R31.1@105.016,40.843
NetC45_2: C45.2 pad.0@125.857,26.975 R30.1 U1.7 U2.3 | length 31.8
  Top Layer w0.254: R30.1@115.756,38.75 115.756,36.908 116.05,36.614 U1.7@116.05,33.811 ; v2(116.15,32.324) U1.7@116.15,33.811 ; U2.3@117.346,16.014 117.346,17.848 v2(117.445,17.947)
  Bottom Layer w0.254: v2(116.15,32.324) 116.15,29.86 117.445,28.565 117.445,26.949 ; v2(117.445,17.947) 117.445,26.949 ; pad.0@125.857,26.949 117.445,26.949
NetC46_1: C46.1 R32.1 U11.64 U11.128 | length 185.9
  Signal Layer 2 w0.762: U11.64@16.67,54.815 29.264,54.815 30.679,56.23 30.679,98.618 32.888,100.828 90.155,100.828 92.278,98.704 92.278,58.141 95.604,54.815 U11.128@103.33,54.815 103.33,48.054 v3(104.75,46.634)
  Bottom Layer w0.762: C46.1@104.75,42.85 v3(104.75,46.634)
NetC46_2: C46.2 R31.2 | length 2.1
  Bottom Layer w0.762: R31.2@106.87,40.843 107.036,41.008 C46.2@107.036,42.85
NetC48_2: C48.2 C51.2 R38.2 | length 4.8
  Bottom Layer w0.508: C51.2@110.922,42.52 110.896,42.545 R38.2@110.896,45.034 111.049,45.187 C48.2@111.049,47.269
NetC49_2: C49.2 P21.5 R35.1 | length 40.6
  Top Layer w0.508: R35.1@106.502,17.742 108.242,17.742 C49.2@108.28,17.78
  Bottom Layer w0.508: P21.5@79.92,5 79.92,14.007 81.636,15.723 106.578,15.723 107.417,16.561 v2(107.417,17.78)
NetC50_2: C50.2 D6.2 R37.1 U3.5 | length 18.6
  Top Layer w0.254: D6.2@96.723,20.599 96.723,25.044 97.475,25.796 103.399,25.796 103.932,25.263 C50.2@103.932,24.477 103.833,24.377 U3.5@103.833,21.334 103.918,21.249 R37.1@106.286,21.249
NetC51_1: C51.1 C52.2 R36.2 R38.1 R39.2 VD5.1 VD6.2 | length 22
  Top Layer w0.508: R36.2@110.173,30.48 110.211,30.518 v2(110.211,31.496)
  Bottom Layer w0.254: R38.1@113.182,45.034 113.182,42.545 C51.1@113.208,42.52
  Bottom Layer w0.508: v2(110.211,31.496) 110.211,32.397 VD6.2@115.689,37.876 115.773,37.96 C52.2@115.773,42.545 ; C51.1@113.182,42.545 C52.2@115.773,42.545 ; R39.2@115.799,45.06 115.799,42.57 C52.2@115.773,42.545
NetC53_1: C53.1 C54.1 L4.2 U13.1 | length 6.2
  Bottom Layer w0.508: U13.1@97.485,31.467 99.875,31.467 99.879,31.471 ; C54.1@99.854,32.211 99.879,32.185 99.879,31.471 ; L4.2@99.879,28.451 99.879,31.471
NetC55_1: C55.1 C56.1 L5.1 U13.8 | length 6.2
  Bottom Layer w0.508: U13.8@97.485,37.012 99.65,37.012 C55.1@99.828,36.833 ; L5.1@99.828,40.542 C55.1@99.828,36.833 ; C55.1@99.854,36.808 C55.1@99.828,36.833
NetC57_1: C57.1 C58.1 L6.2 U14.1 | length 6.3
  Bottom Layer w0.508: U14.1@87.125,31.57 88.647,31.57 C57.1@89.338,32.261 89.363,32.236 C58.1@89.363,30.306 L6.2@89.363,28.426
NetC59_1: C59.1 C60.1 L7.1 U14.8 | length 6.2
  Bottom Layer w0.508: U14.8@87.125,37.115 88.986,37.115 C59.1@89.305,36.796 89.414,36.905 L7.1@89.414,40.593
NetC61_1: C61.1 C62.1 L9.1 U15.8 | length 5.7
  Bottom Layer w0.254: C61.1@79.163,36.807 C61.1@79.225,36.745
  Bottom Layer w0.508: U15.8@77.55,37.039 77.781,36.807 C61.1@79.163,36.807 ; L9.1@79.163,40.604 79.225,40.542 C62.1@79.225,38.752 C61.1@79.225,36.745
NetC63_1: C63.1 C64.1 L8.2 U15.1 | length 5.5
  Bottom Layer w0.508: U15.1@77.55,31.494 79.056,31.494 79.163,31.601 ; L8.2@79.163,28.441 79.163,31.601 ; C64.1@79.203,32.261 79.163,32.221 79.163,31.601
NetD1_1: D1.1 D2.2 R15.2 R18.2 U6.6 | length 10.3
  Top Layer w0.2: D2.2@25.978,25.478 D2.2@26.461,25.478
  Top Layer w0.254: U6.6@22.629,25.478 25.978,25.478 D2.2@26.232,25.732 26.842,25.123 27.051,24.913 R15.2@27.051,22.182 27.051,21.243 26.842,21.033 D1.1@26.156,20.348
NetD3_1: D3.1 R24.2 U2.2 | length 8.1
  Top Layer w0.254: U2.2@116.076,16.014 116.076,13.449 D3.1@117.953,11.572 ; D3.1@118.347,11.178 R24.2@121.26,11.178
NetD3_2: D3.2 D4.1 U2.1 | length 9.2
  Top Layer w0.254: D4.1@110.308,16.271 110.565,16.013 113.203,16.013 ; D3.2@113.381,11.572 113.203,11.75 113.203,16.013 ; U2.1@114.93,16.013 113.203,16.013
NetD5_1: D5.1 R33.2 U3.2 | length 9.1
  Top Layer w0.254: U3.2@101.293,16.084 101.293,13.195 D5.1@103.272,11.216 103.615,11.559 R33.2@106.553,11.559
NetD5_2: D5.2 D6.1 U3.1 | length 9.2
  Top Layer w0.254: D6.1@96.723,16.027 98.781,16.027 ; D5.2@98.268,11.648 98.781,12.161 98.781,16.027 ; 98.781,16.027 98.781,16.084 U3.1@100.023,16.084 99.966,16.027 98.781,16.027
NetP21_4: P21.4 U13.3 | length 36.8
  Top Layer w0.254: P21.4@82.46,2.46 83.718,3.718 83.718,21.565 88.113,25.959 v2(93.497,25.959)
  Bottom Layer w0.254: v2(93.497,25.959) 94.974,27.435 U13.3@94.974,30.884
NetP21_6: P21.6 U13.2 | length 40.4
  Top Layer w0.254: P21.6@79.92,2.46 81.204,3.744 81.204,20.726 87.376,26.899 v2(96.291,26.899)
  Bottom Layer w0.254: U13.2@96.244,30.884 96.244,26.946 v2(96.291,26.899)
NetP21_7: P21.7 R41.1 VD7.1 VD8.2 | length 29
  Top Layer w0.254: P21.7@77.38,5 77.38,19.239 v2(77.419,19.279)
  Bottom Layer w0.254: v2(77.419,19.279) VD7.1@88.516,19.279 ; VD7.1@88.57,19.225 92.008,19.225 R41.1@92.151,19.368
NetP21_8: P21.8 U14.3 | length 32
  Top Layer w0.254: P21.8@77.38,2.46 78.664,3.744 78.664,19.939 v2@84.607,25.883
  Bottom Layer w0.254: U14.3@84.585,31.57 84.607,31.548 v2(84.607,26.01)
NetP21_10: P21.10 U14.2 | length 33.7
  Top Layer w0.254: P21.10@74.84,2.46 76.124,3.744 76.124,19.152 v2(85.855,28.883)
  Bottom Layer w0.254: v2(85.855,28.883) U14.2@85.855,31.57
NetP21_12: P21.12 U15.3 | length 30.2
  Top Layer w0.254: P21.12@72.3,2.46 73.558,3.718 73.558,9.068 75.01,10.519 75.01,28.375 v2(75.032,28.397)
  Bottom Layer w0.254: U15.3@75.01,31.494 75.032,31.472 v2(75.032,28.397)
NetP30_3: P30.3 P30.4 U11.3 | length 127.2
  Signal Layer 2 w0.762: U11.3@15.4,92.915 14.481,92.915 13.77,93.626 13.77,107.563 16.87,110.663 108.148,110.663 111.46,113.975 P30.4@111.46,122.46 P30.3@111.46,125
NetP30_5: P30.5 P30.6 U11.2 | length 126.6
  Signal Layer 2 w0.762: U11.2@16.67,94.185 16.67,104.189 19.004,106.523 108.733,106.523 114.38,112.17 v3@114.38,115.087 ; v3(108.92,119.766) P30.6@108.92,122.46 P30.5@108.92,125
  Bottom Layer w0.762: v3(108.92,119.766) 109.701,119.766 v3@114.38,115.087
  other v3: 114.402,115.087
NetP30_7: P30.7 P30.8 U11.66 | length 32.1
  Top Layer w0.762: U11.66@103.33,94.185 103.33,114.379 106.38,117.429 P30.8@106.38,122.46 P30.7@106.38,125
NetP30_9: P30.9 P30.10 U11.67 | length 36.3
  Top Layer w0.762: P30.9@103.84,125 P30.10@103.84,122.46 v3(103.84,117.597) v3@103.861,117.577 ; U11.67@104.6,92.915 105.945,92.915 107.417,94.386 107.417,115.214 v3(107.442,115.24)
  Signal Layer 1 w0.762: v3(103.84,117.597) 105.085,117.597 v3(107.442,115.24)
NetP30_11: P30.11 P30.12 | length 2.5
  Top Layer w1.27: P30.12@101.3,122.46 P30.11@101.3,125
NetP30_13: P30.13 P30.14 | length 2.5
  Top Layer w1.27: P30.14@98.76,122.46 P30.13@98.76,125
NetP30_15: P30.15 U11.133 | length 44.5
  Top Layer w0.305: 94.945,121.082 94.945,123.725 P30.15@96.22,125
  Top Layer w0.381: U11.133@63.81,108.495 65.475,110.16 90.424,110.16 94.945,114.681 94.945,121.082
NetP30_16: P30.16 U11.134 | length 40.8
  Top Layer w0.508: U11.134@66.35,108.495 91.096,108.495 96.22,113.619 P30.16@96.22,122.46
NetP30_17: P30.17 U11.130 | length 54.1
  Top Layer w0.508: U11.130@56.19,108.495 56.19,111.562 58.369,113.741 84.912,113.741 88.113,116.942 88.113,126.111 89.256,127.254 92.608,127.254 93.68,126.182 P30.17@93.68,125
NetP30_18: P30.18 U11.129 | length 50
  Top Layer w0.508: U11.129@53.673,108.518 U11.129@53.65,108.495 53.65,112.375 56.185,114.91 82.88,114.91 86.182,118.212 v2(86.182,119.99)
  Bottom Layer w0.508: v2(86.182,119.99) 92.634,119.99 93.68,121.036 P30.18@93.68,122.46
NetP30_19: P30.19 U11.131 | length 43.7
  Top Layer w0.381: U11.131@58.73,108.495 62.63,112.395 86.157,112.395 89.51,115.748 89.51,123.37 P30.19@91.14,125
NetP30_20: P30.20 U11.132 | length 39.7
  Top Layer w0.381: U11.132@61.27,108.495 64.103,111.328 86.944,111.328 91.14,115.524 P30.20@91.14,122.46
NetR11_2: R11.2 U10.1 | length 3.9
  Bottom Layer w0.254: U10.1@19.525,22.489 19.543,22.507 R11.2@23.454,22.507
NetR12_2: R12.2 U9.1 | length 4
  Bottom Layer w0.254: U9.1@19.525,15.459 19.539,15.445 R12.2@23.472,15.445
NetR13_2: R13.2 U7.1 | length 4
  Bottom Layer w0.254: U7.1@19.525,29.518 19.575,29.568 R13.2@23.505,29.568
NetR14_2: R14.2 U8.1 | length 4
  Bottom Layer w0.254: U8.1@19.525,36.547 19.544,36.527 R14.2@23.479,36.527
NetR24_1: R24.1 R26.2 U2.6 U2.7 | length 14.2
  Top Layer w0.254: U2.7@116.076,21.264 116.076,19.89 116.469,19.497 119.325,19.497 120.01,18.811 120.01,16.87 120.521,16.36 121.168,16.36 121.209,16.319 R24.1@121.209,13.017 ; 117.346,19.504 U2.6@117.346,21.264
NetR25_1: R25.1 R29.2 U1.3 | length 7.1
  Top Layer w0.254: U1.3@117.32,28.561 117.32,29.782 117.715,30.177 R29.2@122.936,30.177 ; U1.3@117.435,28.455 U1.3@117.435,28.561
NetR27_1: R27.1 U1.5 | length 10.1
  Top Layer w0.254: 113,31.333 112.187,30.52 R27.1@112.187,30.431 113.216,31.46 118.029,31.46 118.59,32.021 U1.5@118.59,33.811
NetR27_2: R27.2 R34.2 U1.1 U1.2 | length 6.6
  Top Layer w0.254: 109.682,28.561 U1.1@114.78,28.561 U1.2@116.05,28.561 ; R34.2@110.435,28.272 R34.2@110.597,28.434
NetR33_1: R33.1 R35.2 U3.6 U3.7 | length 14.2
  Top Layer w0.254: U3.7@101.293,21.334 101.293,19.647 101.824,19.116 104.77,19.116 105.304,18.582 105.304,16.55 105.875,15.979 R35.2@106.502,15.979 ; 102.563,19.299 U3.6@102.563,21.334 ; R35.2@106.502,15.888 106.502,13.424 R33.1@106.553,13.373
NetR34_1: pad.0@99.212,2.718 R34.1 R36.1 U3.3 | length 31.6
  Top Layer w0.254: v1(102.565,13.513) 102.563,13.513 U3.3@102.563,16.084 102.563,17.371 v2(103.2,18.009) ; v2(106.807,27.076) 106.82,27.076 106.845,27.051 108.318,28.524 R36.1@108.318,30.48
  Signal Layer 1 w0.254: v1(102.565,8.56) v1(102.565,13.513)
  Bottom Layer w0.254: pad.0@99.238,2.743 99.238,5.232 v1(102.565,8.56) ; v2(103.2,18.009) 103.276,18.009 104.953,19.685 104.953,25.222 v2(106.807,27.076)
NetR40_2: R40.2 R41.2 U11.65 | length 141.4
  Signal Layer 2 w0.381: U11.65@104.6,94.185 118.67,108.255 124.435,108.255 126.441,106.248 126.441,53.772 124.663,51.994 114.732,51.994 110.617,47.879 v2(106.528,47.879)
  Bottom Layer w0.381: R41.2@92.151,21.222 R40.2@93.777,21.222 ; R40.2@93.802,21.196 93.802,23.139 96.571,25.908 101.956,25.908 103.149,27.102 103.149,46.863 104.165,47.879 v2(106.528,47.879)
NetU6_2: U6.2 U6.3 U6.9 U6.13 | length 15.3
  Top Layer w0.254: U6.13@17.091,20.398 19.098,20.398 ; U6.9@17.091,25.478 18.615,25.478 19.098,24.996 19.098,20.398 ; U6.2@22.629,20.398 20.622,20.398 ; U6.3@22.629,21.668 21.206,21.668 20.622,21.084 20.622,20.398 ; 19.098,20.398 20.622,20.398
NetU6_4: U6.4 U7.2 | length 6.5
  Top Layer w0.254: v2(19.809,25.428) 19.809,23.751 20.622,22.938 U6.4@22.629,22.938
  Bottom Layer w0.254: U7.2@19.525,26.978 19.525,25.712 v2(19.809,25.428)
NetU6_8: U6.8 U8.2 | length 9.2
  Top Layer w0.254: U6.8@17.091,26.748 17.091,33.25 v2(17.828,33.987)
  Bottom Layer w0.254: v2(17.828,33.987) 17.847,34.007 U8.2@19.525,34.007
NetU6_10: U6.10 U9.2 | length 17.2
  Top Layer w0.254: U6.10@17.091,24.208 15.677,24.208 14.628,23.159 14.628,20.907 15.265,20.269 15.265,13.769 16.18,12.855 v2@17.447,12.855
  Bottom Layer w0.254: v2@17.447,12.855 v2(17.512,12.919) U9.2@19.525,12.919
NetU6_12: U6.12 U10.2 | length 6.9
  Top Layer w0.254: v2(15.517,21.059) 15.517,21.364 15.821,21.668 U6.12@17.091,21.668
  Bottom Layer w0.254: v2(15.517,21.059) 15.517,20.297 15.865,19.949 U10.2@19.525,19.949